# Altium PCB MiniPC.PcbDoc (part 16 of 24)
Units mm, origin at the board's own origin, x right, y up, seen from the top; angles counter-clockwise.
Board outline 175 x 155 mm, 16 copper layers (1_Top, 2_int1_(gnd), 3_int2_(power), 4_int3_(gnd), 5_int4_(sign), 6_int5_(power), 7_int6_(sign), 8_int7_(power), 9_int8_(gnd), 10_int9_(sign), 11_int10_(gnd), 12_int11_(sign), 13_int12_(gnd), 14_int13_(power), 15_int14_(gnd), 16_Bottom), stack 2.008 mm thick; 1046 components, 837 nets, 6010 pads, 4009 vias.
Unrouted connection lines stored in the file: 564.
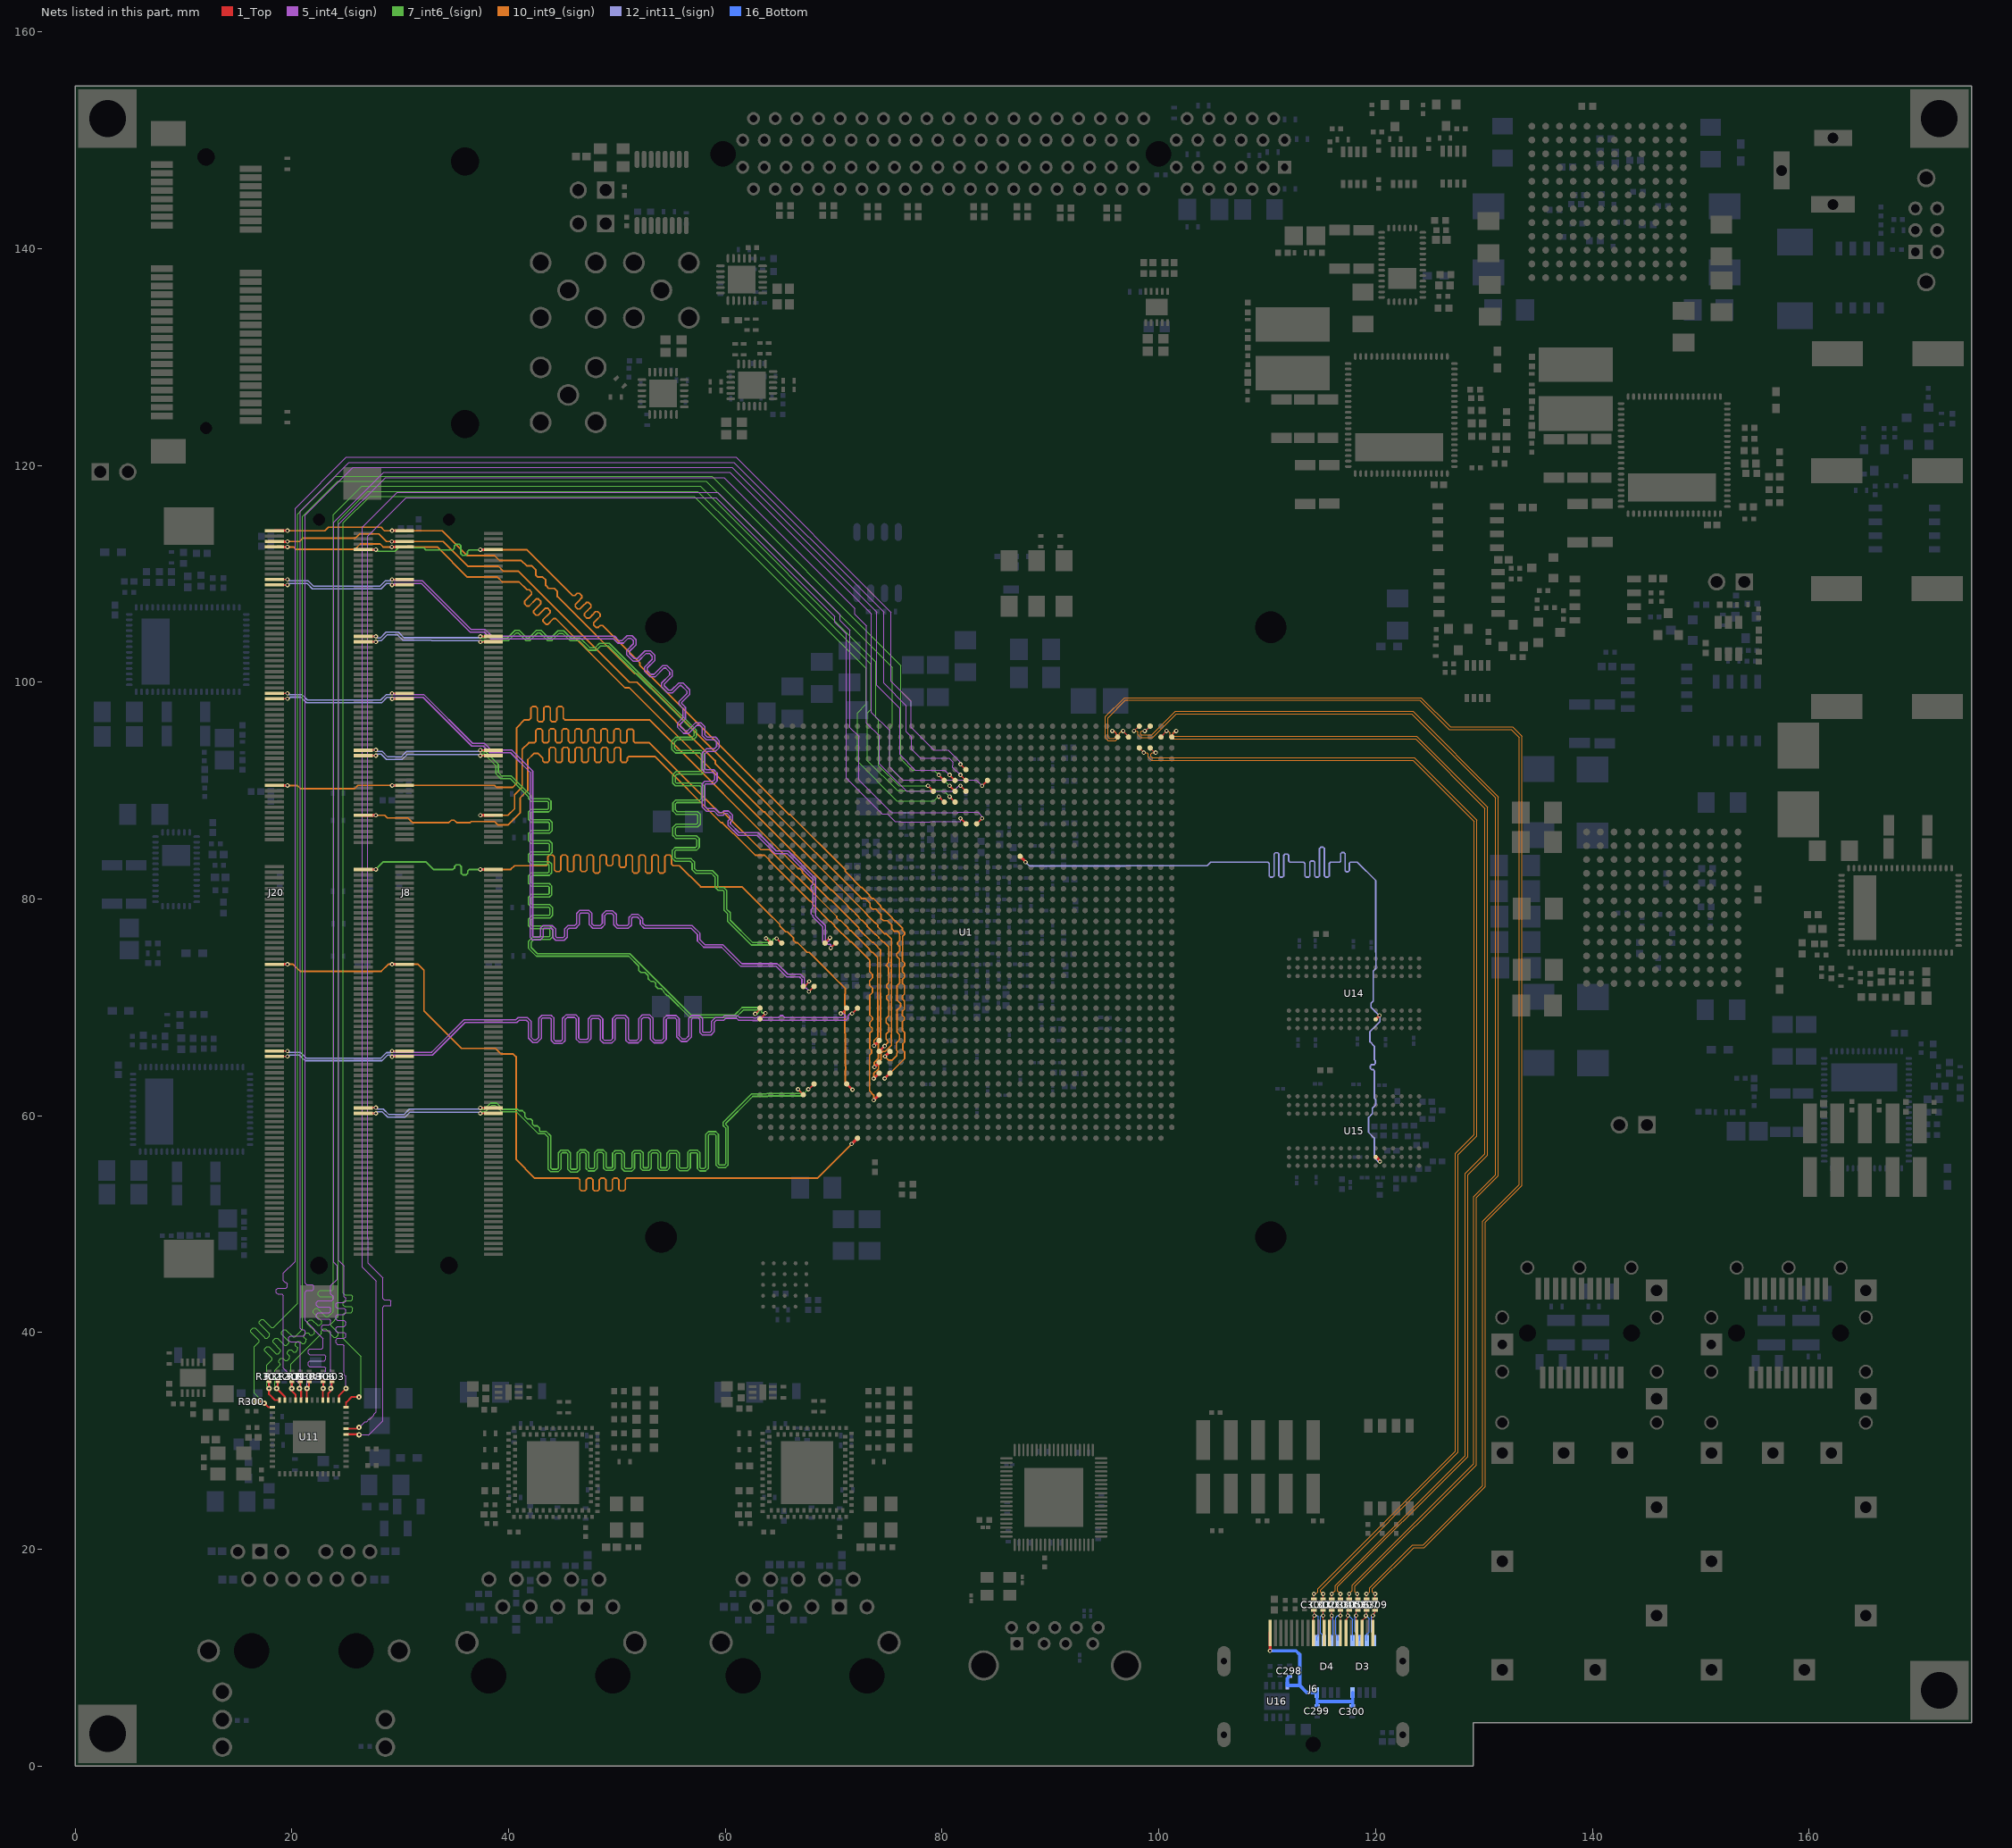
[diagram p28: the nets of this part, all layers, seen from the top]

## Via types
v1: diameter 0.4, hole 0.2, 1_Top to 16_Bottom, tented both sides, 1658 vias
v2: diameter 0.5, hole 0.2, 1_Top to 16_Bottom, tented both sides, 1014 vias
v3: diameter 0.7, hole 0.3, 1_Top to 16_Bottom, tented both sides, 915 vias
v4: diameter 0.6, hole 0.2, 1_Top to 16_Bottom, tented both sides, 278 vias
v5: diameter 0.4, hole 0.2, 1_Top to 16_Bottom, 93 vias
v6: diameter 0.4/0/0/0/0/0/0/0/0/0/0/0/0/0/0/0.4 (per signal layer), hole 0.2, 1_Top to 16_Bottom, tented both sides, 18 vias
v7: diameter 0.4/0/0/0/0/0/0/0/0/0/0/0.4/0.4/0.4/0.4/0.4 (per signal layer), hole 0.2, 1_Top to 16_Bottom, tented both sides, 16 vias
v8: diameter 0.5, hole 0.254, 1_Top to 16_Bottom, tented both sides, 15 vias
v9: diameter 0.5, hole 0.2, 1_Top to 16_Bottom, 2 vias

## Nets (pads, with @x,y where several pads share a name; then routed paths per layer and width w, separated by ;. In a path a pad name is that pad's centre, name@x,y a point inside that pad or via, vN(x,y) a via of type N, cw(c..) or ccw(c..) an arc to the next point about the centre after c; other vN are vias at no path point) (continued)
DDR4_SODIMM_DQS2_N: J8.53 J20.53 U1.AP6 | length 84.2
  1_Top w0.15: J20.53@26.6,60.225 v1(27.75,60.225) ; v1(37.398,60.225) J8.53@38.6,60.225 ; v1(67.65,62.45) 67.7,62.45 68.189,62.939 U1.AP6@68.194,62.939
  7_int6_(sign) w0.13: v1(37.398,60.225) 37.523,60.35 37.839,60.35 38.424,60.935 38.801,60.935 39.376,60.36 40.74,60.36 42.765,58.335 43.365,58.335 43.65,58.05 43.65,55.086 43.901,54.835 44.574,54.835 44.825,55.086 44.825,56.475 44.95,56.6 45.35,56.6 45.475,56.475 45.475,55.061 45.736,54.8 46.325,54.8 46.565,55.04 46.565,56.49 46.685,56.61 47.015,56.61 47.15,56.475 47.15,55.136 47.376,54.91 47.935,54.91 48.165,55.14 48.165,56.5 48.275,56.61 48.64,56.61 48.75,56.5 48.75,55.186 48.976,54.96 49.624,54.96 49.84,55.176 49.84,56.465 49.925,56.55 50.336,56.55 50.45,56.436 50.45,55.136 50.701,54.885 51.374,54.885 51.615,55.126 51.615,56.49 51.675,56.55 52.1,56.55 52.175,56.475 52.175,55.161 52.376,54.96 52.949,54.96 53.165,55.176 53.165,56.476 53.264,56.575 53.675,56.575 53.775,56.475 53.775,55.161 53.976,54.96 54.624,54.96 54.84,55.176 54.84,56.45 54.94,56.55 55.425,56.55 55.525,56.45 55.525,55.186 55.776,54.935 56.524,54.935 56.765,55.176 56.765,56.54 56.8,56.575 57.325,56.575 57.425,56.475 57.425,55.125 57.64,54.91 58.174,54.91 58.425,55.161 58.425,58.2 58.525,58.3 59.025,58.3 59.125,58.2 59.125,55.475 59.365,55.235 60.024,55.235 60.265,55.476 60.265,58.969 60.04,59.194 60.04,59.301 62.329,61.59 ; 62.329,61.591 62.529,61.79 63.901,61.79 63.945,61.834 67.116,61.834 67.308,62.026 67.308,62.125 67.633,62.45 v1(67.65,62.45)
  10_int9_(sign) w0.13: 27.271,60.305 27.191,60.225 ; v1(27.75,60.225) 27.191,60.225 ; 27.191,60.225 27.141,60.175 27.139,60.175 27.089,60.225 27.191,60.225
  12_int11_(sign) w0.13: v1(27.75,60.225) 27.9,60.375 28.35,60.375 28.855,59.87 30.434,59.87 30.904,60.34 37.283,60.34 v1(37.398,60.225)
DDR4_SODIMM_DQS2_P: J8.55 J20.55 U1.AR5 | length 83.4
  1_Top w0.15: J20.55@26.6,60.725 26.628,60.753 v1(27.751,60.753) ; v1(37.398,60.725) J8.55@38.6,60.725 ; v1(66.7,62.45) 66.7,62.438 67.194,61.944 U1.AR5@67.194,61.939
  7_int6_(sign) w0.13: v1(37.398,60.725) 37.523,60.6 37.75,60.6 38.325,61.175 38.9,61.175 39.475,60.6 40.839,60.6 40.964,60.475 41.275,60.475 41.5,60.25 41.5,59.939 41.725,59.714 42.036,59.714 42.2,59.55 42.2,59.239 42.364,59.075 42.65,59.075 42.875,58.85 42.875,58.575 43.464,58.575 43.89,58.149 43.89,55.185 44,55.075 44.475,55.075 44.585,55.185 44.585,56.574 44.851,56.84 45.449,56.84 45.715,56.574 45.715,55.16 45.8,55.075 46.25,55.075 46.325,55.15 46.325,56.589 46.586,56.85 47.114,56.85 47.39,56.574 47.39,55.235 47.475,55.15 47.836,55.15 47.925,55.239 47.925,56.599 48.176,56.85 48.739,56.85 48.99,56.599 48.99,55.285 49.075,55.2 49.525,55.2 49.6,55.275 49.6,56.564 49.826,56.79 50.435,56.79 50.69,56.535 50.69,55.235 50.8,55.125 51.275,55.125 51.375,55.225 51.375,56.589 51.576,56.79 52.199,56.79 52.415,56.574 52.415,55.26 52.475,55.2 52.85,55.2 52.925,55.275 52.925,56.575 53.165,56.815 53.774,56.815 54.015,56.574 54.015,55.26 54.075,55.2 54.525,55.2 54.6,55.275 54.6,56.549 54.841,56.79 55.524,56.79 55.765,56.549 55.765,55.285 55.875,55.175 56.425,55.175 56.525,55.275 56.525,56.639 56.701,56.815 57.424,56.815 57.665,56.574 57.665,55.224 57.739,55.15 58.075,55.15 58.185,55.26 58.185,58.299 58.426,58.54 59.124,58.54 59.365,58.299 59.365,55.574 59.464,55.475 59.925,55.475 60.025,55.575 60.025,58.87 59.8,59.095 59.8,59.4 62.089,61.689 62.429,62.03 63.801,62.03 63.845,62.074 67.017,62.074 67.068,62.125 66.743,62.45 v1(66.7,62.45)
  12_int11_(sign) w0.13: v1(27.751,60.753) 27.889,60.615 28.449,60.615 28.954,60.11 30.335,60.11 30.835,60.61 37.283,60.61 v1(37.398,60.725)
DDR4_SODIMM_DQS3_N: J8.74 J20.74 U1.AG10 | length 88.7
  1_Top w0.15: J20.74@18.4,65.475 v1(19.602,65.475) ; v1(29.25,65.45) 30.375,65.45 J8.74@30.4,65.475 ; v1(71.694,69.439) U1.AG10@72.194,69.939 v1(71.694,69.439)
  5_int4_(sign) w0.13: v1(29.25,65.45) 29.392,65.593 32.967,65.593 33.051,65.676 35.985,68.61 40.765,68.61 40.98,68.825 41.625,68.825 41.825,68.625 41.825,67.176 42.251,66.75 42.639,66.75 43.015,67.126 43.015,68.89 43.16,69.035 43.84,69.035 43.925,68.95 43.925,66.961 44.226,66.66 44.949,66.66 45.215,66.926 45.215,68.89 45.41,69.085 46.09,69.085 46.225,68.95 46.225,67.086 46.501,66.81 47.324,66.81 47.59,67.076 47.59,68.851 47.724,68.985 48.301,68.985 48.45,68.836 48.45,67.011 48.751,66.71 49.524,66.71 49.84,67.026 49.84,68.89 49.985,69.035 50.665,69.035 50.825,68.875 50.825,66.961 51.051,66.735 51.949,66.735 52.265,67.051 52.265,68.89 52.435,69.06 52.915,69.06 53.075,68.9 53.075,67.061 53.401,66.735 54.224,66.735 54.54,67.051 54.54,68.876 54.674,69.01 55.376,69.01 55.5,68.886 55.5,67.287 55.927,66.86 56.449,66.86 56.865,67.276 56.865,68.901 56.974,69.01 57.526,69.01 57.66,68.876 57.66,67.676 57.876,67.46 58.674,67.46 58.96,67.746 58.96,68.621 59.164,68.825 59.864,68.825 60.039,69 61.043,69 61.218,68.825 62.469,68.825 62.499,68.795 63.001,68.795 63.031,68.825 71.138,68.825 71.314,69.001 71.314,69.225 71.528,69.439 v1(71.694,69.439)
  12_int11_(sign) w0.13: v1(19.602,65.475) 19.632,65.475 19.767,65.61 20.701,65.61 21.221,65.09 28.329,65.09 28.832,65.593 29.108,65.593 v1(29.25,65.45)
DDR4_SODIMM_DQS3_P: J8.76 J20.76 U1.AG9 | length 88.5
  1_Top w0.15: J20.76@18.4,65.975 v1(19.602,65.975) ; v1(29.25,65.975) J8.76@30.4,65.975 ; v1(70.65,69.45) 70.705,69.45 U1.AG9@71.194,69.939 v1@70.694,69.439
  5_int4_(sign) w0.13: v1(29.25,65.975) 29.375,65.85 32.886,65.85 32.951,65.916 35.886,68.85 40.666,68.85 40.881,69.065 41.724,69.065 42.065,68.724 42.065,67.275 42.35,66.99 42.54,66.99 42.775,67.225 42.775,68.989 43.061,69.275 43.939,69.275 44.165,69.049 44.165,67.06 44.325,66.9 44.85,66.9 44.975,67.025 44.975,68.989 45.311,69.325 46.189,69.325 46.465,69.049 46.465,67.185 46.6,67.05 47.225,67.05 47.35,67.175 47.35,68.95 47.625,69.225 48.4,69.225 48.69,68.935 48.69,67.11 48.85,66.95 49.425,66.95 49.6,67.125 49.6,68.989 49.886,69.275 50.764,69.275 51.065,68.974 51.065,67.06 51.15,66.975 51.85,66.975 52.025,67.15 52.025,68.989 52.336,69.3 53.014,69.3 53.315,68.999 53.315,67.16 53.5,66.975 54.125,66.975 54.3,67.15 54.3,68.975 54.575,69.25 55.475,69.25 55.74,68.985 55.74,67.386 56.026,67.1 56.35,67.1 56.625,67.375 56.625,69 56.875,69.25 57.625,69.25 57.9,68.975 57.9,67.775 57.975,67.7 58.575,67.7 58.72,67.845 58.72,68.72 59.065,69.065 59.765,69.065 59.94,69.24 61.143,69.24 61.318,69.065 62.569,69.065 62.599,69.035 62.901,69.035 63.016,69.15 63.4,69.15 63.485,69.065 64.9,69.065 65.085,69.25 65.3,69.25 65.485,69.065 71.039,69.065 71.074,69.1 71.074,69.225 70.849,69.45 v1(70.65,69.45)
  12_int11_(sign) w0.13: v1(19.602,65.975) 19.727,65.85 20.8,65.85 21.32,65.33 28.23,65.33 28.733,65.832 29.108,65.832 v1(29.25,65.975)
DDR4_SODIMM_DQS4_N: J8.177 J20.177 U1.AG1 | length 83.1
  1_Top w0.15: J20.177@26.6,93.225 v1(27.75,93.225) ; v1(37.398,93.225) J8.177@38.6,93.225 ; v1(62.75,69.4) 63.194,69.844 U1.AG1@63.194,69.939
  7_int6_(sign) w0.13: v1(37.398,93.225) 37.523,93.35 37.775,93.35 38.81,92.315 38.81,91.576 39.286,91.1 40.161,91.1 41.85,89.411 41.85,89.25 42.09,89.01 43.59,89.01 43.675,88.925 43.675,88.35 43.6,88.275 42.061,88.275 41.85,88.064 41.85,87.311 42.076,87.085 43.665,87.085 43.775,86.975 43.775,86.4 43.7,86.325 42.111,86.325 41.85,86.064 41.85,85.361 42.076,85.135 43.665,85.135 43.775,85.025 43.775,84.4 43.725,84.35 42.061,84.35 41.85,84.139 41.85,83.436 42.076,83.21 43.64,83.21 43.725,83.125 43.725,82.5 43.65,82.425 42.111,82.425 41.85,82.164 41.85,81.436 42.101,81.185 43.665,81.185 43.75,81.1 43.75,80.5 43.675,80.425 42.086,80.425 41.85,80.189 41.85,79.476 42.091,79.235 43.715,79.235 43.825,79.125 43.825,78.6 43.725,78.5 42.175,78.5 41.85,78.175 41.85,77.511 42.101,77.26 43.715,77.26 43.825,77.15 43.825,76.6 43.75,76.525 42.276,76.525 41.85,76.099 41.85,75.436 42.561,74.725 51.086,74.725 52.011,73.8 52.011,73.414 52.207,73.218 52.593,73.218 52.875,72.936 52.875,72.65 53.107,72.418 53.393,72.418 53.58,72.23 53.58,71.945 53.782,71.743 54.068,71.743 54.3,71.511 54.3,71.425 54.645,71.08 54.73,71.08 56.732,69.078 60.968,69.078 61.639,69.75 63.025,69.75 63.1,69.675 63.1,69.575 62.925,69.4 v1(62.75,69.4)
  12_int11_(sign) w0.13: v1(27.75,93.225) 27.9,93.375 28.236,93.375 28.741,92.87 30.195,92.87 30.665,93.34 37.283,93.34 v1(37.398,93.225)
DDR4_SODIMM_DQS4_P: J8.179 J20.179 U1.AH1 | length 82.9
  1_Top w0.15: J20.179@26.6,93.725 26.625,93.75 v1(27.75,93.75) ; v1(37.398,93.725) J8.179@38.6,93.725 ; U1.AH1@63.194,68.939 63.7,69.445 v1(63.7,69.475)
  7_int6_(sign) w0.13: v1(37.398,93.725) 37.489,93.725 37.624,93.59 37.874,93.59 39.05,92.414 39.05,91.675 39.385,91.34 40.26,91.34 42.09,89.51 42.09,89.349 42.189,89.25 43.689,89.25 43.915,89.024 43.915,88.251 43.699,88.035 42.16,88.035 42.09,87.965 42.09,87.41 42.175,87.325 43.764,87.325 44.015,87.074 44.015,86.301 43.799,86.085 42.21,86.085 42.09,85.965 42.09,85.46 42.175,85.375 43.764,85.375 44.015,85.124 44.015,84.301 43.824,84.11 42.16,84.11 42.09,84.04 42.09,83.535 42.175,83.45 43.739,83.45 43.965,83.224 43.965,82.401 43.749,82.185 42.21,82.185 42.09,82.065 42.09,81.535 42.2,81.425 43.764,81.425 43.99,81.199 43.99,80.401 43.774,80.185 42.185,80.185 42.09,80.09 42.09,79.575 42.19,79.475 43.814,79.475 44.065,79.224 44.065,78.501 43.824,78.26 42.274,78.26 42.09,78.076 42.09,77.61 42.2,77.5 43.814,77.5 44.065,77.249 44.065,76.501 43.849,76.285 42.375,76.285 42.09,76 42.09,75.535 42.66,74.965 51.185,74.965 56.832,69.318 60.868,69.318 61.54,69.99 63.124,69.99 63.34,69.774 63.34,69.575 63.44,69.475 v1(63.7,69.475)
  12_int11_(sign) w0.13: v1(27.75,93.75) 27.885,93.615 28.335,93.615 28.84,93.11 30.096,93.11 30.596,93.61 37.283,93.61 v1(37.398,93.725)
DDR4_SODIMM_DQS5_N: J8.198 J20.198 U1.AE6 | length 93.3
  1_Top w0.15: J20.198@18.4,98.475 v1(19.602,98.475) ; v1(29.251,98.455) 30.38,98.455 J8.198@30.4,98.475 ; v1(67.7,71.45) 68.189,71.939 U1.AE6@68.194,71.939
  5_int4_(sign) w0.13: v1(29.251,98.455) 29.392,98.595 32.106,98.595 36.591,94.11 37.676,94.11 38.286,93.5 40.186,93.5 41.985,91.701 ; 41.985,80.068 41.985,91.701 ; v1(67.7,71.45) 67.675,71.475 67.675,71.575 67.481,71.769 67.176,71.769 67.035,71.91 67.035,72.25 67.069,72.284 67.069,72.595 66.849,72.814 65.661,72.814 64.69,73.785 63.831,73.785 63.826,73.79 63.524,73.79 63.519,73.785 61.425,73.785 59.66,75.55 58.001,75.55 57.425,76.126 57.425,76.725 56.84,77.31 52.501,77.31 52.15,77.661 52.15,78.061 51.886,78.325 51.464,78.325 51.34,78.201 51.34,77.601 51.049,77.31 50.016,77.31 49.7,77.626 49.7,78.475 49.5,78.675 49.09,78.675 48.89,78.475 48.89,77.651 48.549,77.31 47.766,77.31 47.45,77.626 47.45,78.575 47.325,78.7 46.65,78.7 46.515,78.565 46.515,77.626 46.199,77.309 45.574,77.309 45.415,77.151 45.415,76.476 45.124,76.185 44.351,76.185 44.1,76.436 44.1,77.135 43.925,77.31 43.275,77.31 43.19,77.225 43.19,76.501 42.924,76.235 42.201,76.235 41.985,76.451 41.985,91.701
  12_int11_(sign) w0.13: v1(19.602,98.475) 19.7,98.475 19.85,98.625 20.836,98.625 21.351,98.11 28.299,98.11 28.784,98.595 29.111,98.595 v1(29.251,98.455)
DDR4_SODIMM_DQS5_P: J8.200 J20.200 U1.AE5 | length 81.9
  1_Top w0.15: J20.200@18.4,98.975 v1(19.602,98.975) ; v1(29.25,98.975) J8.200@30.4,98.975 ; U1.AE5@67.194,71.939 67.194,71.819 67.725,72.35 v1(67.725,72.4)
  5_int4_(sign) w0.13: v1(29.25,98.975) 29.39,98.835 32.205,98.835 36.69,94.35 37.775,94.35 38.385,93.74 40.285,93.74 42.225,91.8 42.225,76.55 42.3,76.475 42.825,76.475 42.95,76.6 42.95,77.324 43.176,77.55 44.024,77.55 44.34,77.234 44.34,76.535 44.45,76.425 45.025,76.425 45.175,76.575 45.175,77.25 45.475,77.55 46.1,77.55 46.275,77.725 46.275,78.664 46.551,78.94 47.424,78.94 47.69,78.674 47.69,77.725 47.865,77.55 48.45,77.55 48.65,77.75 48.65,78.574 48.991,78.915 49.599,78.915 49.94,78.574 49.94,77.725 50.115,77.55 50.95,77.55 51.1,77.7 51.1,78.3 51.365,78.565 51.985,78.565 52.39,78.16 52.39,77.76 52.6,77.55 56.939,77.55 57.665,76.824 57.665,76.225 58.1,75.79 59.759,75.79 61.524,74.025 63.419,74.025 63.424,74.03 63.926,74.03 63.931,74.025 64.789,74.025 65.76,73.054 66.949,73.054 67.309,72.694 67.309,72.185 67.275,72.151 67.275,72.009 67.375,72.009 67.725,72.359 v1(67.725,72.4)
  12_int11_(sign) w0.13: v1(19.602,98.975) 19.611,98.975 v1@19.716,98.869 ; v1@19.712,98.865 20.935,98.865 21.45,98.35 28.2,98.35 28.685,98.835 29.11,98.835 v1(29.25,98.975)
DDR4_SODIMM_DQS6_N: J8.219 J20.219 U1.AA3 | length 85.5
  1_Top w0.15: J20.219@26.6,103.725 26.625,103.75 26.695,103.68 26.765,103.75 26.81,103.705 26.83,103.725 v1(27.75,103.725) ; v1(37.402,103.705) 38.58,103.705 J8.219@38.6,103.725 ; v1(64.725,76.35) 65.061,76.014 65.119,76.014 U1.AA3@65.194,75.939
  7_int6_(sign) w0.13: v1(37.402,103.705) 37.547,103.85 40,103.85 40.7,104.55 40.886,104.55 41.586,103.85 41.975,103.85 42.66,104.535 42.901,104.535 43.586,103.85 43.999,103.85 44.659,104.51 44.99,104.51 45.65,103.85 46.5,103.85 47.4,102.95 48.089,102.95 48.138,102.999 48.489,103.35 49.2,103.35 57.1,95.45 57.1,95.075 56.94,94.915 55.401,94.915 55.06,94.574 55.06,93.801 55.386,93.475 57.65,93.475 57.8,93.325 57.8,91.85 57.715,91.765 55.451,91.765 55.135,91.449 55.135,90.701 55.386,90.45 57.65,90.45 57.8,90.3 57.8,89.275 57.665,89.14 55.426,89.14 55.16,88.874 55.16,88.116 55.451,87.825 57.35,87.825 57.45,87.725 57.45,87 57.34,86.89 55.426,86.89 55.135,86.599 55.135,85.866 55.401,85.6 57.225,85.6 57.35,85.475 57.35,84.85 57.24,84.74 55.351,84.74 55.11,84.499 55.11,83.751 55.386,83.475 56.75,83.475 56.935,83.29 56.935,82.701 57.251,82.385 58.701,82.385 59.06,82.026 59.06,81.101 59.351,80.81 59.765,80.81 59.893,80.683 59.893,78.958 60.21,78.641 60.21,77.951 62.401,75.76 64.217,75.76 64.357,75.901 64.357,76.225 64.482,76.35 v1(64.725,76.35)
  12_int11_(sign) w0.13: v1(27.75,103.725) 27.875,103.725 27.975,103.825 28.25,103.825 28.795,104.37 29.741,104.37 30.251,103.86 32.875,103.86 32.885,103.85 37.257,103.85 v1(37.402,103.705)
DDR4_SODIMM_DQS6_P: J8.221 J20.221 U1.AA2 | length 85.2
  1_Top w0.15: J20.221@26.6,104.225 26.625,104.2 26.65,104.225 v1(27.75,104.225) ; v1(37.398,104.225) J8.221@38.6,104.225 ; v1(63.75,76.375) 63.75,76.383 U1.AA2@64.194,75.939
  7_int6_(sign) w0.13: v1(37.398,104.225) 37.398,104.152 37.46,104.09 37.875,104.09 37.935,104.15 38.25,104.15 38.31,104.09 39.901,104.09 40.601,104.79 40.985,104.79 41.685,104.09 41.876,104.09 42.561,104.775 43,104.775 43.685,104.09 43.9,104.09 44.56,104.75 45.089,104.75 45.749,104.09 46.599,104.09 47.499,103.19 47.99,103.19 48.039,103.239 48.39,103.59 49.299,103.59 57.34,95.549 57.34,94.976 57.039,94.675 55.5,94.675 55.3,94.475 55.3,93.9 55.485,93.715 57.749,93.715 58.04,93.424 58.04,91.751 57.814,91.525 55.55,91.525 55.375,91.35 55.375,90.8 55.485,90.69 57.749,90.69 58.04,90.399 58.04,89.176 57.764,88.9 55.525,88.9 55.4,88.775 55.4,88.215 55.55,88.065 57.449,88.065 57.69,87.824 57.69,86.901 57.439,86.65 55.525,86.65 55.375,86.5 55.375,85.965 55.5,85.84 57.324,85.84 57.59,85.574 57.59,84.751 57.339,84.5 55.45,84.5 55.35,84.4 55.35,83.85 55.485,83.715 56.849,83.715 57.175,83.389 57.175,82.8 57.35,82.625 58.8,82.625 59.3,82.125 59.3,81.2 59.45,81.05 59.864,81.05 60.133,80.782 60.133,79.058 60.45,78.74 60.45,78.05 62.5,76 64.117,76 64.117,76.225 63.967,76.375 v1(63.75,76.375)
  12_int11_(sign) w0.13: v1(27.75,104.225) 27.78,104.225 27.94,104.065 28.151,104.065 28.696,104.61 29.84,104.61 30.35,104.1 37.273,104.1 v1(37.398,104.225)
DDR4_SODIMM_DQS7_N: J8.240 J20.240 U1.AA8 | length 91.5
  1_Top w0.15: J20.240@18.4,108.975 v1(19.602,108.975) ; v1(29.25,108.975) J8.240@30.4,108.975 ; v1(69.725,75.479) 70.186,75.939 U1.AA8@70.194,75.939
  5_int4_(sign) w0.13: v1(29.25,108.975) 29.325,108.975 29.45,109.1 31.961,109.1 36.451,104.61 37.751,104.61 38.361,104 49.675,104 50.07,103.605 50.594,103.605 51.045,104.055 51.295,104.055 51.525,103.825 51.525,103.55 50.91,102.935 50.91,102.526 51.501,101.935 51.974,101.935 52.689,102.65 53,102.65 53.25,102.4 53.25,102.1 52.56,101.41 52.56,100.976 53.051,100.485 53.51,100.485 54.325,101.3 54.5,101.3 54.875,100.925 54.875,100.675 54.11,99.91 54.11,99.565 54.665,99.01 55.124,99.01 55.807,99.693 55.932,99.693 56.475,99.15 56.475,98.975 55.73,98.23 55.73,97.945 56.075,97.6 56.075,96.7 55.61,96.235 55.61,95.826 56.151,95.285 56.624,95.285 57.369,96.03 57.645,96.03 57.85,95.825 57.85,95.076 58.241,94.685 58.99,94.685 59.2,94.475 59.2,94.075 58.975,93.85 58.251,93.85 57.85,93.449 57.85,91.961 58.126,91.685 58.84,91.685 59,91.525 59,91 58.85,90.85 58.086,90.85 57.85,90.614 57.85,88.486 58.226,88.11 58.951,88.11 59.326,87.735 59.799,87.735 59.939,87.875 60.186,87.875 60.435,87.626 60.435,87.399 60.235,87.199 60.235,86.826 61.186,85.875 62.9,85.875 64.595,84.18 65.705,84.18 68.069,81.817 68.069,81.369 67.925,81.225 67.925,80.894 68.069,80.75 68.069,79.194 67.925,79.05 67.925,78.61 68.06,78.475 68.06,78.365 68.985,77.44 68.985,76.035 69.201,75.818 69.707,75.818 69.725,75.8 v1(69.725,75.479)
  12_int11_(sign) w0.13: v1(19.602,108.975) 19.727,109.1 21.411,109.1 21.901,108.61 28.235,108.61 28.725,109.1 29.125,109.1 v1(29.25,108.975)
DDR4_SODIMM_DQS7_P: J8.242 J20.242 U1.AA7 | length 91.1
  1_Top w0.15: J20.242@18.4,109.475 v1(19.602,109.475) ; v1(29.25,109.475) J8.242@30.4,109.475 ; U1.AA7@69.194,75.939 69.194,75.969 v1(69.65,76.425)
  5_int4_(sign) w0.13: v1(29.25,109.475) 29.325,109.475 29.46,109.34 30.026,109.34 32.06,109.34 36.55,104.85 37.85,104.85 38.46,104.24 49.774,104.24 50.17,103.845 50.495,103.845 50.945,104.295 51.394,104.295 51.765,103.924 51.765,103.451 51.15,102.836 51.15,102.625 51.6,102.175 51.875,102.175 52.59,102.89 53.099,102.89 53.49,102.499 53.49,102.001 52.8,101.311 52.8,101.075 53.15,100.725 53.411,100.725 54.226,101.54 54.599,101.54 55.115,101.024 55.115,100.576 54.35,99.811 54.35,99.664 54.764,99.25 55.025,99.25 55.708,99.933 56.092,99.933 56.715,99.31 56.715,98.876 55.97,98.13 55.97,98.045 56.315,97.699 56.315,96.601 55.85,96.136 55.85,95.925 56.25,95.525 56.525,95.525 57.27,96.27 57.745,96.27 58.09,95.924 58.09,95.175 58.34,94.925 59.089,94.925 59.44,94.574 59.44,93.976 59.074,93.61 58.35,93.61 58.09,93.35 58.09,92.06 58.225,91.925 58.939,91.925 59.24,91.624 59.24,90.901 58.949,90.61 58.185,90.61 58.09,90.515 58.09,88.585 58.325,88.35 59.05,88.35 59.425,87.975 59.7,87.975 59.84,88.115 60.285,88.115 60.675,87.725 60.675,87.3 60.475,87.1 60.475,86.925 61.285,86.115 62.999,86.115 64.694,84.42 65.805,84.42 68.309,81.916 68.309,78.455 69.225,77.539 69.225,76.134 69.292,76.067 69.492,76.067 69.65,76.225 v1(69.65,76.425)
  12_int11_(sign) w0.13: v1(19.602,109.475) 19.727,109.35 21.5,109.35 22,108.85 28.136,108.85 28.636,109.35 29.125,109.35 v1(29.25,109.475)
DDR4_SODIMM_ODT0: J8.155 U1.AK12 | length 78.5
  1_Top w0.25: v1(37.398,87.725) J8.155@38.6,87.725 ; v1(73.725,66.47) U1.AK12@74.194,66.939
  10_int9_(sign) w0.15: v1(37.398,87.725) 39.95,87.725 40.55,88.325 40.55,89.625 41.26,90.335 41.26,93.81 41.86,94.41 42.375,94.41 42.525,94.56 42.525,95.547 42.675,95.697 42.975,95.697 43.125,95.547 43.125,94.56 43.275,94.41 43.575,94.41 43.725,94.56 43.725,95.547 43.875,95.697 44.175,95.697 44.325,95.547 44.325,94.56 44.475,94.41 44.775,94.41 44.925,94.56 44.925,95.547 45.075,95.697 45.375,95.697 45.525,95.547 45.525,94.56 45.675,94.41 45.975,94.41 46.125,94.56 46.125,95.547 46.275,95.697 46.575,95.697 46.725,95.547 46.725,94.56 46.875,94.41 47.175,94.41 47.325,94.56 47.325,95.547 47.475,95.697 47.775,95.697 47.925,95.547 47.925,94.56 48.075,94.41 48.375,94.41 48.525,94.56 48.525,95.547 48.675,95.697 48.975,95.697 49.125,95.547 49.125,94.56 49.275,94.41 49.575,94.41 49.725,94.56 49.725,95.547 49.875,95.697 50.175,95.697 50.325,95.547 50.325,94.56 50.475,94.41 50.775,94.41 50.925,94.56 50.925,95.547 51.028,95.65 51.422,95.65 51.525,95.547 51.525,94.56 51.675,94.41 52.99,94.41 59.425,87.975 59.85,87.975 63.275,84.55 64.07,84.55 66.57,82.05 66.625,82.05 70.28,78.395 70.28,78.245 70.499,78.025 70.63,78.025 71.319,77.336 71.319,77.284 71.539,77.064 71.611,77.064 73.3,75.375 73.3,75.295 73.52,75.075 73.6,75.075 74.054,74.621 74.054,70.631 74.08,70.605 74.08,70.295 74.079,70.294 74.079,67.294 73.725,66.94 v1(73.725,66.47)
DDR4_SODIMM_ODT1: J20.155 U1.AR12 | length 90.5
  1_Top w0.25: J20.155@26.6,87.725 v1(27.75,87.725) ; v1(73.694,61.439) U1.AR12@74.194,61.939
  10_int9_(sign) w0.15: v1(27.75,87.725) 28.575,87.725 28.825,87.475 30.7,87.475 31.125,87.05 34.5,87.05 34.725,87.275 34.975,87.275 35.2,87.05 36.45,87.05 36.55,87.15 38.7,87.15 39,86.85 39.975,86.85 41.06,87.935 41.06,89.31 41.77,90.02 41.77,92.855 42.34,93.425 42.725,93.425 43.15,93 43.15,92.754 43.3,92.604 43.6,92.604 43.75,92.754 43.75,93.831 43.9,93.981 44.2,93.981 44.35,93.831 44.35,92.754 44.5,92.604 44.8,92.604 44.95,92.754 44.95,93.831 45.1,93.981 45.4,93.981 45.55,93.831 45.55,92.754 45.7,92.604 46,92.604 46.15,92.754 46.15,93.831 46.3,93.981 46.6,93.981 46.75,93.831 46.75,92.754 46.9,92.604 47.2,92.604 47.35,92.754 47.35,93.831 47.5,93.981 47.8,93.981 47.95,93.831 47.95,92.754 48.1,92.604 48.4,92.604 48.55,92.754 48.55,93.831 48.7,93.981 49,93.981 49.15,93.831 49.15,92.754 49.3,92.604 49.6,92.604 49.75,92.754 49.75,93.831 49.9,93.981 50.2,93.981 50.35,93.831 50.35,92.754 50.5,92.604 50.8,92.604 50.95,92.754 50.95,93 51.1,93.15 53.501,93.15 59.612,87.039 59.722,87.039 60.722,86.039 60.761,86.039 62.76,84.04 63.624,84.04 64.069,83.595 64.069,83.534 67.789,79.814 67.849,79.814 68.069,79.595 68.069,79.506 69.65,77.925 69.739,77.925 70.069,77.595 70.069,77.505 71.524,76.05 71.625,76.05 73.304,74.371 73.304,74.298 73.325,74.277 73.325,73.63 73.304,73.609 73.304,73.298 73.575,73.027 73.575,72.73 73.304,72.459 73.304,72.148 73.325,72.127 73.325,72.025 73.575,71.775 73.575,71.375 73.325,71.125 73.325,70.601 73.319,70.595 73.319,70.284 73.329,70.274 73.329,69.298 73.575,69.052 73.575,68.855 73.329,68.609 73.329,68.296 73.55,68.075 73.55,67.83 73.325,67.605 73.325,66.225 73.5,66.05 73.5,65.797 73.308,65.605 73.308,62.292 73.694,61.906 v1(73.694,61.439)
DDR4_SODIMM_PARITY: J8.143 J20.143 U1.AP9 | length 88.4
  1_Top w0.25: J20.143@26.6,82.725 v1(27.75,82.725) ; v1(37.398,82.725) J8.143@38.6,82.725 ; U1.AP9@71.194,62.939 v1(71.725,62.408)
  7_int6_(sign) w0.15: v1(27.75,82.725) 28.45,83.425 32.375,83.425 33.075,82.725 34.875,82.725 35.025,82.875 35.025,83 35.175,83.15 35.475,83.15 35.625,83 35.625,82.375 35.775,82.225 36.075,82.225 36.225,82.375 36.225,82.575 36.375,82.725 v1(37.398,82.725)
  10_int9_(sign) w0.15: v1(37.398,82.725) 40.2,82.725 40.55,83.075 43.475,83.075 43.625,83.225 43.625,83.912 43.775,84.062 44.075,84.062 44.225,83.912 44.225,82.678 44.375,82.528 44.675,82.528 44.825,82.678 44.825,83.912 44.975,84.062 45.275,84.062 45.425,83.912 45.425,82.678 45.575,82.528 45.875,82.528 46.025,82.678 46.025,83.912 46.175,84.062 46.475,84.062 46.625,83.912 46.625,82.678 46.775,82.528 47.075,82.528 47.225,82.678 47.225,83.912 47.375,84.062 47.675,84.062 47.825,83.912 47.825,82.538 47.975,82.388 48.275,82.388 48.425,82.538 48.425,83.912 48.575,84.062 48.875,84.062 49.025,83.912 49.025,83.225 49.175,83.075 49.475,83.075 49.625,83.225 49.625,83.912 49.775,84.062 50.075,84.062 50.225,83.912 50.225,83.067 50.375,82.917 50.675,82.917 50.825,83.067 50.825,83.912 50.975,84.062 51.275,84.062 51.425,83.912 51.425,82.538 51.575,82.388 51.875,82.388 52.025,82.538 52.025,83.912 52.175,84.062 52.475,84.062 52.625,83.912 52.625,82.538 52.775,82.388 53.075,82.388 53.225,82.538 53.225,83.912 53.375,84.062 53.675,84.062 53.825,83.912 53.825,82.538 53.975,82.388 54.275,82.388 54.425,82.538 54.425,83.912 54.575,84.062 54.875,84.062 55.025,83.912 55.025,83.225 55.175,83.075 55.775,83.075 57.725,81.125 61.525,81.125 63.775,78.875 63.805,78.875 65.025,77.655 65.025,77.52 65.57,76.975 65.73,76.975 66.275,76.43 66.275,76.195 66.495,75.975 66.655,75.975 67.325,75.305 67.325,75.295 67.545,75.075 67.737,75.075 69.925,72.887 69.925,72.875 71.069,71.731 71.069,71.284 71.025,71.24 71.025,67.63 71.05,67.605 71.05,65.608 71.052,65.605 71.052,65.295 71.05,65.292 71.05,64.63 71.1,64.58 71.1,64.27 71.052,64.222 71.052,63.081 v1(71.725,62.408)
DDR4_SODIMM_RESET_CONN: J8.108 J20.108 U1.AW10 | length 80.9
  1_Top w0.25: J20.108@18.4,73.975 v1(19.602,73.975) ; v1(29.25,73.975) J8.108@30.4,73.975 ; v1(71.65,57.4) 71.655,57.4 U1.AW10@72.194,57.939
  10_int9_(sign) w0.15: v1(19.602,73.975) 20.125,73.975 20.775,73.325 28.25,73.325 28.9,73.975 v1(29.25,73.975) 31.65,73.975 32.2,73.425 32.2,69.675 35.65,66.225 38.8,66.225 39.325,65.7 40.438,65.7 40.688,65.45 40.688,55.988 42.425,54.25 46.425,54.25 46.575,54.1 46.575,53.222 46.725,53.072 47.025,53.072 47.175,53.222 47.175,54.1 47.325,54.25 47.625,54.25 47.775,54.1 47.775,53.222 47.925,53.072 48.225,53.072 48.375,53.222 48.375,54.1 48.525,54.25 48.825,54.25 48.975,54.1 48.975,53.222 49.125,53.072 49.425,53.072 49.575,53.222 49.575,54.1 49.725,54.25 50.025,54.25 50.175,54.1 50.175,53.222 50.325,53.072 50.625,53.072 50.775,53.222 50.775,54.1 50.925,54.25 68.5,54.25 v1(71.65,57.4)
DDR4_SODIMM_SA0: J8.256 J20.256 U1.AN12 | length 88.6
  1_Top w0.25: J20.256@18.4,112.975 v1(19.602,112.975) ; v1(29.225,112.975) J8.256@30.4,112.975 ; v1(73.694,63.439) U1.AN12@74.194,63.939
  10_int9_(sign) w0.15: v1(19.602,112.975) 20.72,112.975 21.045,113.3 25.875,113.3 26.25,113.675 28.05,113.675 28.75,112.975 v1(29.225,112.975) 33.95,112.975 36.225,110.7 39.05,110.7 39.5,110.25 40.9,110.25 51.15,100 51.837,100 59.069,92.768 59.069,92.501 63.545,88.025 63.639,88.025 72.855,78.808 72.855,78.8 73.075,78.58 73.075,78.528 73.789,77.814 73.849,77.814 74.069,77.595 74.069,77.431 74.725,76.775 74.855,76.775 75.329,76.302 75.329,75.12 75.325,75.116 75.325,74.701 75.333,74.692 75.333,74.464 75.304,74.434 75.304,74.123 75.333,74.094 75.333,73.983 75.304,73.954 75.304,73.764 75.328,73.74 75.328,73.533 75.304,73.509 75.304,73.198 75.329,73.173 75.329,70.688 ; v1(73.694,63.439) 73.694,63.909 74.125,64.34 74.125,64.958 74.35,65.183 74.35,65.75 74.529,65.929 74.729,65.929 75.325,66.525 75.325,67.152 75.304,67.173 75.304,67.484 75.325,67.505 75.325,68.1 75.33,68.105 75.33,70.687
DDR4_SODIMM_SA1: J8.260 J20.260 U1.AL13 | length 90.4
  1_Top w0.25: J20.260@18.4,113.975 v1(19.602,113.975) ; v1(29.25,113.975) J8.260@30.4,113.975 ; v1(74.73,65.475) U1.AL13@75.194,65.939
  10_int9_(sign) w0.15: v1(19.602,113.975) 23.05,113.975 23.375,114.3 28.225,114.3 28.55,113.975 v1(29.25,113.975) 33.9,113.975 36.2,111.675 38.725,111.675 39.175,111.225 41.175,111.225 41.662,110.738 42.138,110.738 42.5,110.375 42.5,109.9 42.7,109.7 43.15,109.7 43.425,109.425 43.425,108.925 43.7,108.65 44.225,108.65 44.5,108.375 44.5,107.9 51.615,100.785 51.845,100.785 64.075,88.555 64.075,88.528 72.55,80.053 72.889,80.053 73.35,79.592 73.35,79.295 73.57,79.075 73.867,79.075 74.35,78.592 74.35,78.22 74.57,78 74.942,78 75.35,77.592 75.35,77.245 75.57,77.025 75.917,77.025 76.075,76.867 76.075,76.555 76.1,76.53 76.1,76.195 75.88,75.975 75.88,75.82 76.079,75.621 76.079,75.198 75.825,74.945 75.825,74.7 76.075,74.45 76.075,72.605 76.079,72.602 76.079,72.248 75.85,72.02 75.85,70.65 76.175,70.325 76.175,70.075 75.9,69.8 75.85,69.8 75.85,67.7 76.075,67.475 76.075,67.025 75.775,66.725 75.775,66.075 75.863,65.987 75.863,65.812 75.825,65.775 75.825,65.575 75.375,65.125 75.079,65.125 v1(74.73,65.475)
DDR4_SODIMM_SA2: J8.166 J20.166 U1.AM12 | length 90.7
  1_Top w0.25: J20.166@18.4,90.475 v1(19.602,90.475) ; v1(29.251,90.479) 30.396,90.479 J8.166@30.4,90.475 ; v1(73.75,64.495) U1.AM12@74.194,64.939
  10_int9_(sign) w0.15: v1(19.602,90.475) 20.5,90.475 20.8,90.175 25.8,90.175 26.104,90.479 v1(29.251,90.479) 38.696,90.479 38.875,90.3 40.375,90.3 40.75,90.675 40.75,95.8 41.475,96.525 41.9,96.525 42.05,96.675 42.05,97.606 42.2,97.756 42.5,97.756 42.65,97.606 42.65,96.501 42.8,96.351 43.1,96.351 43.25,96.501 43.25,97.606 43.4,97.756 43.7,97.756 43.85,97.606 43.85,96.501 44,96.351 44.3,96.351 44.45,96.501 44.45,97.606 44.6,97.756 44.9,97.756 45.05,97.606 45.05,96.675 45.2,96.525 52.983,96.525 66.708,82.8 66.88,82.8 67.1,82.58 67.1,82.45 69.65,79.9 69.764,79.9 72.319,77.345 72.319,77.233 73.548,76.004 73.652,76.004 74.05,75.605 74.05,75.552 74.33,75.272 74.33,74.925 74.304,74.899 74.304,71.323 74.33,71.297 74.33,69.61 ; v1(73.75,64.495) 73.75,64.936 74.1,65.286 74.1,66.675 74.329,66.904 74.329,69.609
DDR4_SODIMM_SCL: J8.253 J20.253 U1.AN13 | length 89.8
  1_Top w0.25: J20.253@26.6,112.225 v1(27.75,112.225) ; v1(37.398,112.225) J8.253@38.6,112.225 ; v1(74.694,63.439) U1.AN13@75.194,63.939
  7_int6_(sign) w0.15: v1(27.75,112.225) 27.9,112.075 29.525,112.075 29.85,112.4 32.175,112.4 32.375,112.2 34.85,112.2 35,112.35 35,112.575 35.15,112.725 35.45,112.725 35.6,112.575 35.6,111.85 35.75,111.7 36.05,111.7 36.2,111.85 36.2,112.05 36.35,112.2 37.32,112.2 37.345,112.225 v1(37.398,112.225)
  10_int9_(sign) w0.15: v1(37.398,112.225) 41.675,112.225 45.906,107.994 46.118,107.994 46.326,108.201 46.538,108.201 46.75,107.989 46.75,107.777 46.436,107.464 46.155,107.183 46.155,106.97 46.367,106.758 46.58,106.758 46.861,107.039 47.174,107.353 47.386,107.353 47.599,107.141 47.599,106.929 47.285,106.615 47.004,106.334 47.004,106.122 47.216,105.91 47.428,105.91 47.709,106.191 48.023,106.504 48.235,106.504 48.447,106.292 48.447,106.08 48.133,105.767 47.852,105.486 47.852,105.273 48.065,105.061 48.277,105.061 48.452,105.236 48.664,105.236 52.125,101.775 52.125,101.539 65.889,87.775 65.996,87.775 71.069,82.702 71.069,82.534 72.539,81.064 72.599,81.064 73.3,80.364 73.3,80.27 73.52,80.05 73.655,80.05 74.329,79.377 74.329,79.274 74.552,79.05 74.614,79.05 75.4,78.264 75.4,78.22 75.62,78 75.664,78 76.325,77.339 76.325,77.125 76.55,76.9 76.55,76.755 76.35,76.555 76.35,75.066 76.325,75.041 76.325,74.295 76.55,74.07 76.55,73.875 76.325,73.65 76.325,73.295 76.525,73.095 76.525,72.755 76.329,72.559 76.329,72.248 76.525,72.052 76.525,71.225 76.325,71.025 76.325,70.8 76.525,70.6 76.525,69.825 76.325,69.625 76.325,69.275 76.514,69.086 76.514,68.861 76.325,68.672 76.325,67.9 76.55,67.675 76.55,66.825 76.375,66.65 76.375,66.05 76.55,65.875 76.55,65.296 v1(74.694,63.439)
DDR4_SODIMM_SDA: J8.254 J20.254 U1.AL12 | length 90.8
  1_Top w0.25: J20.254@18.4,112.475 v1(19.602,112.475) ; v1(29.225,112.475) J8.254@30.4,112.475 ; U1.AL12@74.194,65.939 v1(74.694,66.439)
  10_int9_(sign) w0.15: v1(19.602,112.475) 20.15,112.475 20.375,112.25 25.825,112.25 26.325,112.75 28.15,112.75 28.425,112.475 v1(29.225,112.475) 33.425,112.475 36.2,109.7 38.975,109.7 39.425,109.25 40.975,109.25 41.7,108.525 41.903,108.525 42.124,108.305 42.124,108.101 41.471,107.449 41.471,107.236 41.684,107.024 41.896,107.024 42.548,107.677 42.752,107.677 42.972,107.456 42.972,107.253 42.32,106.6 42.32,106.388 42.532,106.176 42.744,106.176 43.397,106.828 43.6,106.828 43.821,106.608 43.821,106.404 43.168,105.752 43.168,105.632 43.473,105.327 43.593,105.327 44.139,105.874 44.351,105.874 50.735,99.49 51.14,99.49 66.354,84.276 66.354,84.22 69.759,80.814 69.849,80.814 71.319,79.345 71.319,79.284 71.539,79.064 71.599,79.064 72.325,78.339 72.325,78.27 72.545,78.05 72.614,78.05 73.069,77.595 73.069,77.501 73.816,76.754 73.859,76.754 74.15,76.463 74.15,76.42 74.545,76.025 74.638,76.025 75.079,75.584 75.079,75.223 75.075,75.22 75.075,74.589 75.083,74.58 75.083,74.567 75.054,74.538 75.054,74.129 74.825,73.9 74.825,73.889 75.078,73.637 75.054,73.612 75.054,73.095 75.075,73.073 75.075,72.275 74.875,72.075 74.875,71.875 75.075,71.675 75.075,71.225 74.875,71.025 74.875,70.788 75.08,70.584 75.08,70.273 ; v1(74.694,66.439) 75,66.745 75,66.895 74.825,67.071 74.825,67.525 75.075,67.775 75.075,68.375 74.825,68.625 74.825,68.975 75.079,69.229 75.079,70.272
DDR4_WEN: U1.N25 U14.L2 U15.L2 | length 85.5
  1_Top w0.25: U1.N25@87.194,83.939 87.7,83.433 v1(87.7,83.4) ; U15.L2@120,56.2 120.065,56.2 120.365,55.9 120.335,55.87 120.4,55.805 v1(120.4,55.78) ; U14.L2@120,68.9 120.372,69.272 v1(120.35,69.272)
  12_int11_(sign) w0.15: v1(87.7,83.4) 88.05,83.05 96.905,83.05 96.93,83.075 104.45,83.075 104.775,83.4 109.5,83.4 109.725,83.4 110.062,83.4 110.175,83.288 110.175,82.131 110.287,82.019 110.512,82.019 110.625,82.131 110.625,83.4 110.625,84.156 110.737,84.268 110.962,84.268 111.075,84.156 111.075,83.4 111.075,82.131 111.187,82.019 111.412,82.019 111.525,82.131 111.525,83.4 111.525,84.028 111.637,84.141 111.862,84.141 111.975,84.028 111.975,83.512 112.087,83.4 112.425,83.4 112.8,83.4 113.025,83.4 113.362,83.4 113.475,83.288 113.475,82.131 113.587,82.019 113.812,82.019 113.925,82.131 113.925,83.4 114.037,83.512 114.262,83.512 114.375,83.4 114.375,82.131 114.487,82.019 114.712,82.019 114.825,82.131 114.825,83.4 114.825,84.669 114.937,84.781 115.162,84.781 115.275,84.669 115.275,83.4 115.275,82.131 115.387,82.019 115.612,82.019 115.725,82.131 115.725,83.288 115.837,83.4 116.175,83.4 116.4,83.4 116.45,83.4 116.675,83.4 116.775,83.5 116.775,84.183 116.875,84.283 117.075,84.283 117.175,84.183 117.175,83.4 117.175,82.617 117.275,82.517 117.475,82.517 117.575,82.617 117.575,83.3 117.675,83.4 117.775,83.4 118.3,83.4 120.003,81.697 120.003,75.098 120.025,75.076 120.025,73.604 119.775,73.354 119.775,70.576 119.575,70.376 119.575,70.024 120.327,69.272 v1(120.35,69.272) 120.4,69.222 120.4,68.701 119.475,67.776 119.475,66.825 119.875,66.425 119.875,65.4 119.875,65.175 119.965,65.085 119.965,64.815 119.875,64.725 119.622,64.725 119.51,64.613 119.51,64.388 119.622,64.275 119.763,64.275 119.875,64.163 119.875,63.9 119.875,61.626 120,61.501 120,61 119.7,60.7 119.7,60.201 119.345,59.846 119.345,58.485 119.875,57.955 119.875,56.926 119.875,56.876 119.875,56.126 120.221,55.78 v1(120.4,55.78)
DP_3V3: C298.2 C299.2 C300.2 D3.8 D4.8 J6.20 U16.4 | length 17
  1_Top w0.3: v1(110.25,10.65) J6.20@110.25,12.29
  16_Bottom w0.3: v1(110.25,10.65) 112.65,10.65 113,10.3 113,7.45 ; C298.2@112.05,8.3 111.85,8.1 U16.4@111.85,7.45 113,7.45 ; D4.8@114.55,6.8 113.65,6.8 113,7.45 ; D4.8@114.575,6.8 114.575,5.975 ; C299.2@114.6,5.575 114.575,5.6 114.575,5.975 ; C300.2@117.85,5.55 117.875,5.575 117.875,5.9 ; D3.8@117.875,6.8 117.875,5.975 114.575,5.975
DP_ML_LANE0_C_N: C307.2 D3.3 J6.3 | length 4.8
  1_Top w0.1: J6.3@118.75,12.29 118.75,13.44 119.1,13.79 v1(119.1,13.89) 119.15,13.94 C307.2@119.15,14.4
  16_Bottom w0.1: v1(119.1,13.89) 119.39,13.6 119.39,12.373 119.175,12.158 D3.3@119.175,11.6
DP_ML_LANE0_C_P: C309.2 D3.4 J6.1 | length 4.6
  1_Top w0.1: J6.1@119.75,12.29 v1(119.75,13.9) 119.75,13.99 119.95,14.19 C309.2@119.95,14.4
  16_Bottom w0.1: v1(119.75,13.9) 119.61,13.76 119.61,12.373 119.825,12.158 D3.4@119.825,11.6
DP_ML_LANE0_N: C307.1 U1.B34 | length 130.4
  1_Top w0.1: v1(95.7,95.5) 95.8,95.5 96.194,95.106 U1.B34@96.194,94.939 ; C307.1@119.15,15.4 v1(119.15,15.9) v1@119.15,16.05
  10_int9_(sign) w0.09: v1(95.7,95.5) 95.875,95.5 96.1,95.275 96.1,95.025 95.9,94.825 95.425,94.825 95.3,94.95 95.3,96.725 96.91,98.335 124.076,98.335 126.786,95.625 132.525,95.625 133.25,94.9 133.25,53.664 129.86,50.274 129.86,25.899 124.376,20.415 123.416,20.415 119.46,16.459 119.46,16.1 119.26,15.9 v1(119.15,15.9)
DP_ML_LANE0_P: C309.1 U1.B35 | length 131.9
  1_Top w0.1: v1(96.7,95.5) 96.7,95.488 97.194,94.994 U1.B35@97.194,94.939 ; C309.1@119.95,15.4 v1(119.95,15.9) v1@119.95,16.05
  10_int9_(sign) w0.09: v1(96.7,95.5) 96.565,95.5 96.34,95.275 96.34,94.926 95.999,94.585 95.326,94.585 95.06,94.851 95.06,96.824 96.811,98.575 124.175,98.575 126.885,95.865 132.624,95.865 133.49,94.999 133.49,53.565 130.1,50.175 130.1,25.8 124.475,20.175 123.515,20.175 119.7,16.36 119.7,16.1 119.9,15.9 v1(119.95,15.9)
DP_ML_LANE1_C_N: C305.2 D3.1 J6.6 | length 4.9
  1_Top w0.1: J6.6@117.25,12.29 117.25,13.54 117.55,13.84 117.49,13.9 v1(117.445,13.9) 117.445,14.295 C305.2@117.55,14.4
  16_Bottom w0.1: v1(117.445,13.9) 117.5,13.9 117.875,13.525 D3.1@117.875,11.6
DP_ML_LANE1_C_P: C306.2 D3.2 J6.4 | length 4.8
  1_Top w0.1: J6.4@118.25,12.29 118.2,12.34 v1(118.2,13.9) 118.2,14.35 118.25,14.4 C306.2@118.35,14.4
  16_Bottom w0.1: v1(118.2,13.9) 118.1,13.8 118.1,12.4 118.525,11.975 D3.2@118.525,11.6
DP_ML_LANE1_N: C305.1 U1.A36 | length 118.3
  1_Top w0.1: v1(97.7,95.5) 98.139,95.939 U1.A36@98.194,95.939 ; C305.1@117.55,15.4 v1(117.55,15.9) v1@117.55,16.05
  10_int9_(sign) w0.09: v1(97.7,95.5) 97.955,95.5 98.08,95.375 98.08,95.126 98.308,94.897 99.437,94.897 101.624,97.085 123.326,97.085 131.08,89.33 131.08,54.57 129.06,52.549 129.06,27.899 117.86,16.699 117.86,16.21 v1(117.55,15.9)
DP_ML_LANE1_P: C306.1 U1.A37 | length 118.2
  1_Top w0.1: v1(98.7,95.5) 98.755,95.5 U1.A37@99.194,95.939 ; C306.1@118.35,15.4 v1@118.35,16
  10_int9_(sign) w0.09: v1(98.7,95.5) 98.445,95.5 98.32,95.375 98.32,95.225 98.408,95.137 99.338,95.137 101.525,97.325 123.425,97.325 131.32,89.43 131.32,54.47 129.3,52.45 129.3,27.8 118.1,16.6 118.1,16.1 v1(118.3,15.9)
DP_ML_LANE2_C_N: C303.2 D4.3 J6.9 | length 4.6
  1_Top w0.1: J6.9@115.75,12.29 115.75,13.44 115.95,13.64 v1(115.95,13.9) C303.2@115.95,14.4
  16_Bottom w0.1: D4.3@115.875,11.6 115.875,11.975 116.09,12.19 116.09,13.76 v1(115.95,13.9)
DP_ML_LANE2_C_P: C304.2 D4.4 J6.7 | length 4.8
  1_Top w0.1: J6.7@116.75,12.29 116.75,13.54 v1(116.75,13.9) C304.2@116.75,14.4
  16_Bottom w0.1: D4.4@116.525,11.6 116.525,11.975 116.31,12.19 116.31,13.71 116.5,13.9 v1(116.75,13.9)
DP_ML_LANE2_N: C303.1 U1.B38 | length 112.2
  1_Top w0.1: U1.B38@100.194,94.939 100.194,94.994 v1(100.7,95.5) ; C303.1@115.95,15.4 v1(115.95,15.9) v1@115.95,16.05
  10_int9_(sign) w0.09: v1(100.7,95.5) 100.83,95.5 101.03,95.3 101.03,94.995 101.265,94.76 123.676,94.76 130.08,88.355 130.08,56.495 128.26,54.674 128.26,28.659 116.26,16.659 116.26,16.21 v1(115.95,15.9)
DP_ML_LANE2_P: C304.1 U1.B39 | length 112.2
  1_Top w0.1: U1.B39@101.194,94.939 101.194,95.094 v1(101.6,95.5) ; C304.1@116.75,15.4 v1(116.75,15.9) v1@116.75,16.05
  10_int9_(sign) w0.09: v1(101.6,95.5) 101.47,95.5 101.27,95.3 101.27,95.094 101.364,95 123.775,95 130.32,88.455 130.32,56.395 128.5,54.575 128.5,28.56 116.5,16.56 116.5,16.15 v1(116.75,15.9)
DP_ML_LANE3_C_N: C301.2 D4.1 J6.12 | length 4.8
  1_Top w0.1: J6.12@114.25,12.29 114.25,13.8 v1(114.35,13.9) C301.2@114.35,14.4
  16_Bottom w0.1: v1(114.35,13.9) 114.6,13.9 114.7,13.8 114.7,12.1 114.575,11.975 D4.1@114.575,11.6
DP_ML_LANE3_C_P: C302.2 D4.2 J6.10 | length 4.8
  1_Top w0.1: C302.2@115.15,14.4 v1(115.15,13.9) 115.15,13.45 115.25,13.35 J6.10@115.25,12.29
  16_Bottom w0.1: v1(115.15,13.9) 115,13.9 114.92,13.82 114.92,12.28 115.225,11.975 D4.2@115.225,11.6
DP_ML_LANE3_N: C301.1 U1.C36 | length 112.1
  1_Top w0.1: U1.C36@98.194,93.906 U1.C36@98.194,93.939 98.6,93.533 v1(98.6,93.5) ; C301.1@114.3,15.4 v1(114.3,15.9) v1@114.3,16
  10_int9_(sign) w0.09: v1(98.6,93.5) 98.9,93.5 99.03,93.37 99.03,93.07 99.3,92.8 123.461,92.8 129.1,87.161 129.1,58.264 127.36,56.524 127.36,29.06 114.66,16.36 114.66,16.1 114.46,15.9 v1(114.3,15.9) v1@114.3,16
DP_ML_LANE3_P: C302.1 U1.C37 | length 112
  1_Top w0.1: U1.C37@99.194,93.939 99.633,93.5 v1(99.7,93.5) ; C302.1@115.15,15.4 v1(115.15,15.9) v1@115.15,16.05
  10_int9_(sign) w0.09: v1(99.7,93.5) 99.4,93.5 99.27,93.37 99.27,93.17 99.399,93.04 123.56,93.04 129.34,87.26 129.34,58.165 127.6,56.425 127.6,28.961 114.9,16.261 114.9,16.1 115.1,15.9 v1(115.15,15.9)
ENET_HPS_GTX_CLK: U1.H18 U11.24 | length 160.7
  1_Top w0.15: v1(79.694,89.439) U1.H18@80.194,88.939
  1_Top w0.17: U11.24@25.012,33.125 25.012,33.562 25.5,34.05 v2@26.1,34.05
  7_int6_(sign) w0.1: v2(26.2,34.05) 26.375,34.225 26.375,37.8 24.75,39.425 24.75,41.713 24.887,41.85 25.483,41.85 25.62,41.988 25.62,42.263 25.483,42.4 24.887,42.4 24.75,42.538 24.75,42.813 24.887,42.95 25.483,42.95 25.62,43.088 25.62,43.363 25.483,43.5 24.887,43.5 24.75,43.638 24.75,114.691 27.209,117.15 57.1,117.15 72.979,101.271 72.979,97.979 72.175,97.175 72.175,92.696 75.821,89.05 79.238,89.05 79.694,89.506 v1(79.694,89.439)
ENET_HPS_MDC: R302.1 U1.G19 U11.36 | length 169.7
  1_Top w0.15: v1(80.694,90.439) U1.G19@81.194,89.939
  1_Top w0.17: R302.1@17.9,35.55 v2(17.9,34.85) 17.9,34.325 18.45,33.775 U11.36@18.862,33.775
  7_int6_(sign) w0.1: v2(17.9,34.85) 17.7,35.05 17.7,36.996 18.162,37.458 18.161,37.652 17.498,38.316 17.498,38.511 17.692,38.705 17.886,38.705 18.55,38.041 18.745,38.041 18.939,38.236 18.939,38.43 18.275,39.094 18.275,39.289 18.47,39.483 18.664,39.483 19.328,38.819 19.523,38.819 19.717,39.014 19.717,39.208 19.053,39.872 19.053,40.066 19.248,40.261 19.442,40.261 20.106,39.597 20.3,39.597 21,40.296 21,115.275 24.255,118.53 58.246,118.53 75.4,101.376 75.4,96.1 75.2,95.9 75.2,92.1 76.325,90.975 80.158,90.975 v1(80.694,90.439)
ENET_HPS_MDIO: R300.1 U1.F18 U11.37 | length 168.7
  1_Top w0.15: v1(79.694,91.439) U1.F18@80.194,90.939
  1_Top w0.17: R300.1@16.75,33.65 17.302,33.65 v2(17.461,33.49) 17.827,33.125 U11.37@18.212,33.125
  7_int6_(sign) w0.1: v2(17.461,33.49) 16.525,34.427 16.525,38.7 16.947,39.122 16.947,39.317 16.215,40.049 16.215,40.244 16.409,40.438 16.604,40.438 17.433,39.608 17.539,39.502 17.734,39.502 17.928,39.697 17.928,39.891 16.992,40.827 16.992,41.022 17.187,41.216 17.381,41.216 18.114,40.483 18.308,40.483 20.525,42.7 20.525,115.475 24.04,118.99 58.761,118.99 76.21,101.541 76.21,92.923 77.233,91.9 79.233,91.9 v1(79.694,91.439)
ENET_HPS_RX_CLK: R312.2 U1.G17 U11.35 | length 168.4
  1_Top w0.15: v1(78.694,90.439) U1.G17@79.194,89.939
  1_Top w0.17: R312.2@18.7,35.55 18.7,34.95 v2(18.6,34.85) 19.362,34.088 U11.35@19.362,33.775
  7_int6_(sign) w0.1: v2(18.6,34.85) 18.425,35.025 18.425,36.525 18.925,37.025 18.925,37.112 18.793,37.244 18.793,37.439 18.987,37.633 19.182,37.633 19.358,37.458 19.385,37.43 19.58,37.43 19.774,37.624 19.774,37.819 19.571,38.022 19.571,38.217 19.765,38.411 19.96,38.411 20.135,38.235 20.163,38.208 20.357,38.208 20.552,38.402 20.552,38.597 20.524,38.624 20.349,38.8 20.349,38.995 20.543,39.189 20.737,39.189 20.913,39.013 20.941,38.986 21.135,38.986 21.33,39.18 21.33,39.375 21.302,39.402 21.126,39.578 21.126,39.772 21.321,39.967 21.515,39.967 21.691,39.791 21.719,39.763 21.913,39.763 22.107,39.958 22.107,40.152 22.08,40.18 21.46,40.8 21.46,40.994 21.654,41.189 21.849,41.189 22.372,40.666 22.566,40.666 22.761,40.861 22.761,41.055 21.976,41.84 21.976,42.034 22.17,42.229 22.365,42.229 23.149,41.444 23.344,41.444 23.83,41.93 23.83,43.188 23.693,43.325 22.583,43.325 22.445,43.463 22.445,43.738 22.583,43.875 23.693,43.875 23.83,44.013 23.83,115.431 26.469,118.07 57.681,118.07 73.899,101.852 73.899,96.766 74.15,96.514 74.15,92.3 76.011,90.439 v1(78.694,90.439)
ENET_HPS_RX_DV: R309.1 U1.H19 U11.33 | length 161.8
  1_Top w0.15: v1(80.694,89.439) U1.H19@81.194,88.939
  1_Top w0.17: R309.1@20,35.55 v2(20,34.85) 20,34.625 20.362,34.263 U11.33@20.362,33.775
  7_int6_(sign) w0.1: v2(20,34.85) 19.9,34.95 19.9,37.1 22.713,39.913 22.713,39.968 ; 22.714,39.966 22.726,39.955 ; 22.727,39.953 22.727,40.148 22.921,40.342 23.116,40.342 23.129,40.329 23.887,39.571 24.081,39.571 24.276,39.766 24.276,39.96 23.615,40.621 23.615,40.815 24.29,41.49 24.29,114.882 27.018,117.61 57.465,117.61 61.025,114.05 61.05,114.05 73.439,101.661 73.439,97.484 73.101,97.146 73.101,92.761 75.883,89.979 78.884,89.979 78.93,90.025 80.108,90.025 v1(80.694,89.439)
ENET_HPS_RXD0: R310.2 U1.E20 U11.32 | length 166.6
  1_Top w0.15: v1(81.694,92.439) U1.E20@82.194,91.939
  1_Top w0.17: v2@20.7,34.75 20.862,34.588 U11.32@20.862,33.775 ; v2(20.7,34.85) 20.8,34.95 R310.2@20.8,35.55
  5_int4_(sign) w0.1: v2@20.725,34.85 20.725,35.225 19.225,36.725 19.225,43.413 19.088,43.55 18.705,43.55 18.567,43.688 18.567,43.963 18.705,44.1 19.45,44.1 19.588,44.238 19.588,44.513 19.45,44.65 19.363,44.65 19.225,44.788 19.225,45.485 20.315,46.575 20.315,116.04 25.02,120.745 60.984,120.745 75.302,106.428 75.302,100.073 77.15,98.225 77.15,95.825 79.225,93.75 80.55,93.75 81.694,92.606 v1(81.694,92.439)
ENET_HPS_RXD1: R308.2 U1.F20 U11.31 | length 167.3
  1_Top w0.15: v1(81.694,91.439) U1.F20@82.194,90.939
  1_Top w0.17: U11.31@21.362,33.775 21.362,34.811 v2(21.4,34.85) 21.6,35.05 R308.2@21.6,35.55
  5_int4_(sign) w0.1: v2(21.4,34.85) 21.4,35.6 20.775,36.225 20.775,39.013 20.637,39.15 19.863,39.15 19.726,39.288 19.726,39.563 19.863,39.7 21.114,39.7 21.251,39.838 21.251,40.113 21.114,40.25 20.913,40.25 20.775,40.388 20.775,115.8 25.26,120.285 60.794,120.285 74.614,106.465 74.614,99.911 76.69,97.835 76.69,95.435 77.175,94.95 77.175,93.825 78,93 80.649,93 81.025,92.624 81.025,92.334 80.983,92.293 80.983,92.15 v1(81.694,91.439)
ENET_HPS_RXD2: R306.2 U1.F19 U11.28 | length 170.2
  1_Top w0.17: U11.28@22.862,33.775 22.862,34.811 v2(22.9,34.85) R306.2@22.9,35.55 ; v1(80.694,91.439) U1.F19@81.194,90.939
  5_int4_(sign) w0.1: v2(22.9,34.85) 22.9,36.198 23.14,36.438 23.14,36.713 23.002,36.85 21.653,36.85 21.515,36.988 21.515,37.263 21.653,37.4 23.002,37.4 23.14,37.538 23.14,37.813 23.002,37.95 21.653,37.95 21.515,38.088 21.515,38.363 21.653,38.5 22.763,38.5 22.9,38.638 22.9,39.45 21.235,41.115 21.235,43.738 21.372,43.875 21.893,43.875 22.031,44.013 22.031,44.288 21.893,44.425 21.372,44.425 21.235,44.563 21.235,115.41 25.65,119.825 60.603,119.825 73.95,106.478 73.95,99.725 76.1,97.575 76.1,93.325 77.525,91.9 80.225,91.9 80.576,91.549 v1@80.675,91.549
ENET_HPS_RXD3: R303.2 U1.F22 U11.27 | length 170.2
  1_Top w0.17: U11.27@23.362,33.775 23.362,34.412 23.6,34.65 v2(23.6,34.85) 23.7,34.95 R303.2@23.7,35.55 ; v1(83.694,90.439) U1.F22@84.194,90.939
  5_int4_(sign) w0.1: v2(23.6,34.85) 23.6,40.038 23.462,40.175 22.89,40.175 22.753,40.313 22.753,40.588 22.89,40.725 23.462,40.725 23.6,40.863 23.6,41.138 23.462,41.275 22.417,41.275 22.28,41.413 22.28,41.688 22.417,41.825 23.462,41.825 23.6,41.963 23.6,42.238 23.462,42.375 22.417,42.375 22.28,42.513 22.28,42.788 22.417,42.925 23.697,42.925 23.834,43.063 23.834,43.338 23.6,43.572 23.6,44.325 24.2,44.925 24.2,46.149 23.88,46.469 23.88,114.756 28.469,119.345 31.02,119.345 ; 31.025,119.35 31.02,119.345 ; v1(83.694,90.439) 83.158,90.975 76.351,90.975 75.15,92.176 75.15,95.553 73.49,97.213 73.49,106.288 60.433,119.345 31.02,119.345
ENET_HPS_TX_EN: U1.G20 U11.25 | length 166.3
  1_Top w0.15: v1(81.694,90.439) U1.G20@82.194,89.939
  1_Top w0.17: U11.25@24.362,33.775 24.362,34.204 25,34.843 v2(25,34.85)
  5_int4_(sign) w0.1: v2(25,34.85) 24.965,34.885 24.965,35.985 24.825,36.125 24.825,38.788 24.687,38.925 24.197,38.925 24.06,39.063 24.06,39.338 24.197,39.475 24.828,39.475 24.965,39.613 24.965,39.888 24.828,40.025 24.197,40.025 24.06,40.163 24.06,40.438 24.197,40.575 24.828,40.575 24.965,40.713 24.965,40.988 24.828,41.125 24.197,41.125 24.06,41.263 24.06,41.538 24.197,41.675 24.828,41.675 24.965,41.813 24.965,42.088 24.828,42.225 24.197,42.225 24.06,42.363 24.06,42.638 24.197,42.775 24.828,42.775 24.965,42.913 24.965,43.188 24.825,43.328 24.825,46.174 24.34,46.659 24.34,114.566 28.659,118.885 59.867,118.885 71.95,106.802 71.95,106.272 73.025,105.197 73.025,96.227 74.2,95.052 74.2,92.475 76.725,89.95 81.071,89.95 81.561,90.439 v1(81.694,90.439)
ENET_HPS_TXD0: U1.K20 U11.19 | length 165.1
  1_Top w0.17: U11.19@25.012,30.625 26.169,30.625 v2(26.213,30.582) ; v1(81.694,87.439) U1.K20@82.194,86.939
  5_int4_(sign) w0.1: v2(26.213,30.582) 27.043,30.582 27.075,30.55 28.4,31.875 28.4,42.338 28.537,42.475 29.152,42.475 29.152,42.888 29.015,43.025 28.537,43.025 28.4,43.163 28.4,45.05 27.025,46.425 27.025,48.65 27,48.675 27,113.475 30.55,117.025 59.124,117.025 70.11,106.039 70.11,105.51 71.175,104.445 71.175,91.125 74.45,87.85 74.975,87.85 75.675,87.15 76.1,87.15 76.125,87.125 78.93,87.125 78.955,87.15 81.694,87.15 v1(81.694,87.439)
ENET_HPS_TXD1: U1.K21 U11.20 | length 165.3
  1_Top w0.17: U11.20@25.012,31.125 26.076,31.125 v2(26.2,31.25) ; U1.K21@83.194,86.939 v1(83.694,87.439)
  5_int4_(sign) w0.1: v2(26.2,31.25) 26.75,31.8 26.9,31.8 27.125,32.025 27.2,32.025 27.575,32.4 27.575,32.475 27.8,32.7 27.8,44.775 26.525,46.05 26.525,114.3 29.725,117.5 59.3,117.5 70.57,106.23 70.57,105.701 71.5,104.771 71.5,95.8 72.3,95 72.3,91 75.325,87.975 81.446,87.975 81.47,87.999 83.301,87.999 83.694,87.606 v1(83.694,87.439)